# Altium PCB STM32H743I-EVAL2PCBDESIGN.PcbDoc (part 12 of 23)
Units mil, origin at the board's own origin, x right, y up, seen from the top; angles counter-clockwise.
Board outline 6558 x 5417 mil, 8 copper layers (L1_TOP, L2_GND, L3_HS1, L4_POWER, L5_SIG, L6_HS2, L7_GND, L8_BOTTOM), stack 61.368 mil thick; 620 components, 588 nets, 2945 pads, 1724 vias.
Unrouted connection lines stored in the file: 1.
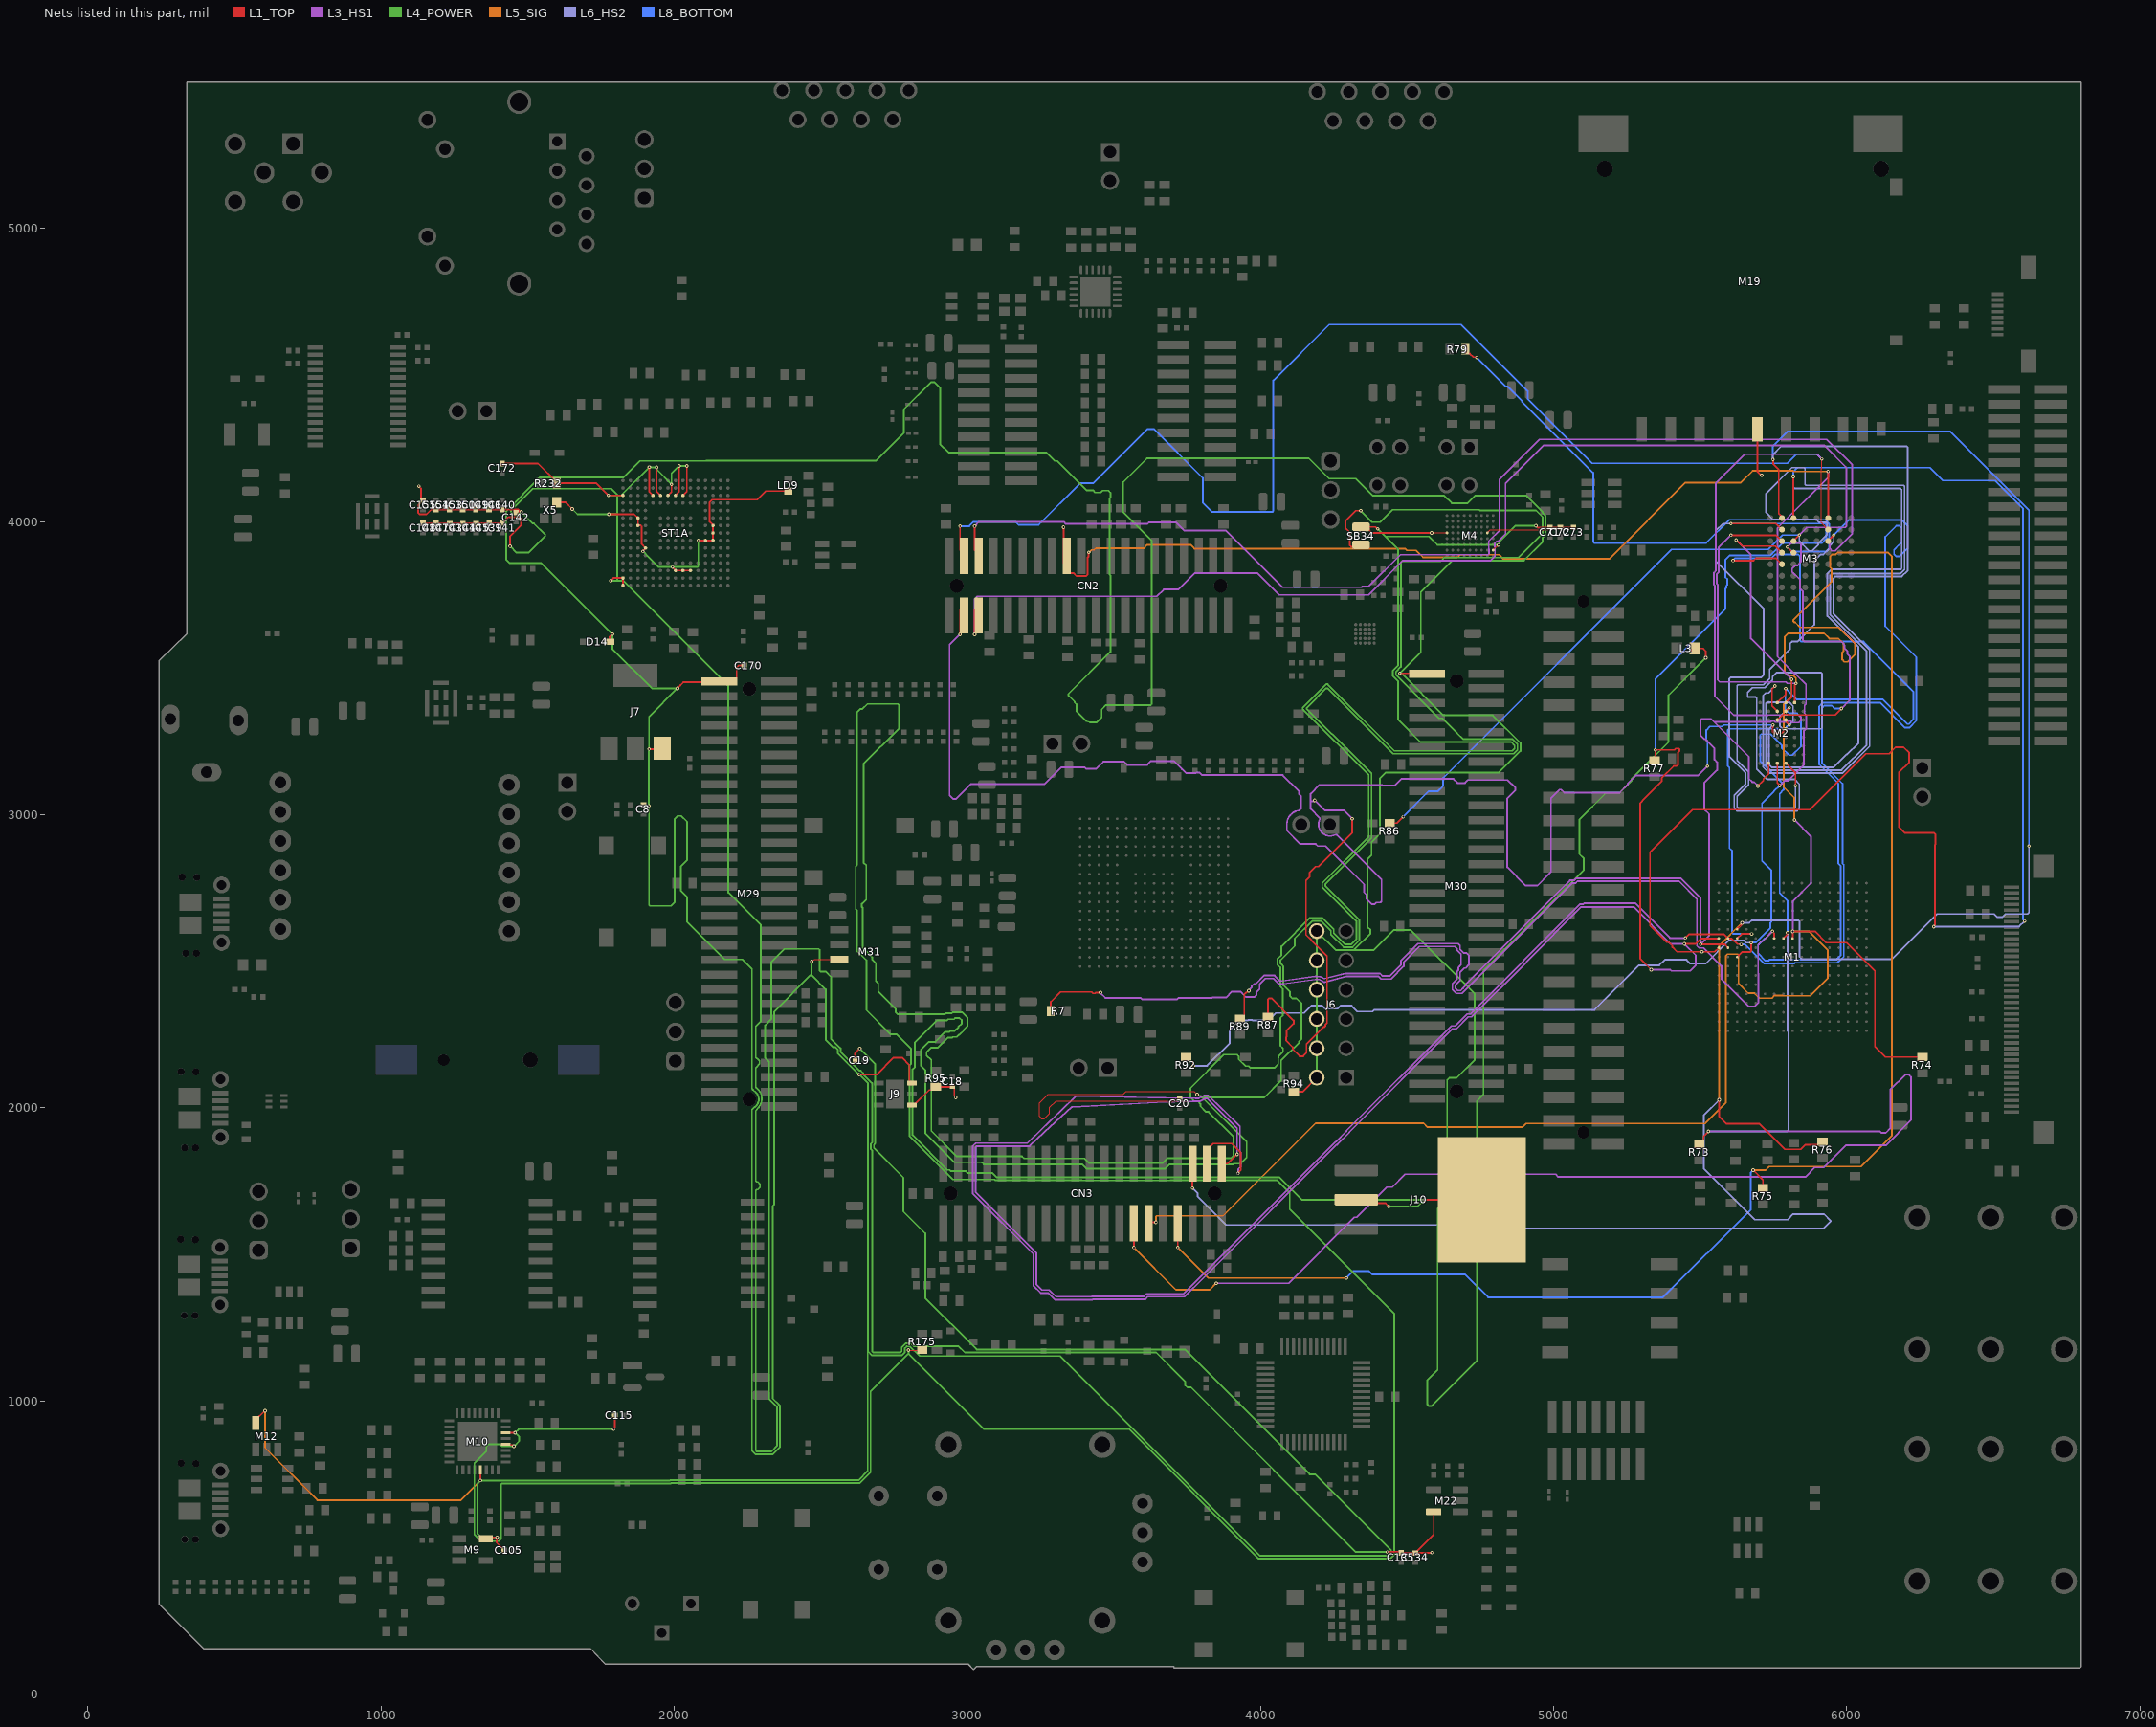
[diagram p9: the nets of this part, all layers, seen from the top]

## Via types
v1: diameter 12, hole 6, L1_TOP to L8_BOTTOM, tented both sides, 1724 vias

## Nets (pads, with @x,y where several pads share a name; then routed paths per layer and width w, separated by ;. In a path a pad name is that pad's centre, name@x,y a point inside that pad or via, vN(x,y) a via of type N, cw(c..) or ccw(c..) an arc to the next point about the centre after c; other vN are vias at no path point)
+1V8: C71.1 C72.1 C73.1 C115.1 M4.D1 M4.D8 M4.G9 M10.28 M10.30 R175.2 SB34.2 | length 18132
  L1_TOP w2: M4.D8@4774.06,3961.69 4783.75,3971.38 4978.53,3971.38 4978.76,3971.62 4979.78,3971.62 C71.1@4988,3979.83
  L1_TOP w4: v1(2799,1173) 2845.56,1173 R175.2@2846,1173.44 ; v1(4584,3961.43) M4.D1@4636,3961.43 ; M4.G9@4793.74,3902.63 v1(4812,3920)
  L1_TOP w6: M10.28@1425.5,851 1427.5,849 1447.38,849 1451.38,845 v1(1453,845) ; M10.30@1425.5,891 v1(1457,891) ; v1(1793.73,903.47) 1793.73,905.1 1797.17,908.53 C115.1@1797.17,950 ; SB34.2@4343,3982 SB34.2@4358,3982 ; v1(4400,3975) 4398.38,3975 4391.38,3982 SB34.2@4358,3982 ; v1(4584,3961.43) 4378.57,3961.43 SB34.2@4358,3982 ; v1(4940,3986) 4946.17,3979.83 C71.1@4988,3979.83 C72.1@5023,3979.83 C73.1@5068,3979.83
  L4_POWER w6: v1(1793.73,903.47) 1469.47,903.47 v1(1457,891) 1471,877 1471,863 v1(1453,845) 1412.35,845 1405.35,852 1366.32,852 1359,844.68 1359,828.33 1318,787.33 1318,543.37 1340.37,521 1401.38,521 1409,528.62 1409,714.49 1412.51,718 1988.77,718 1989.77,719 2632.63,719 2670,756.37 2670,1032.24 2798.62,1160.86 ; v1(2799,1173) 2799.38,1172.62 2799.38,1160.86 3057.24,903 3552.38,903 3994.38,461 4442.53,461 4456,474.47 4456,1298 4099.78,1654.22 4099.78,1708.83 4055.62,1753 3692.99,1753 3691.99,1752 3390.01,1752 3389.01,1753 3095.38,1753 3093.38,1755 2950.33,1755 2803,1902.33 2803,1919.72 2803,2144.49 2807.51,2149 2807.51,2201.87 2758.95,2250.44 2738.34,2250.44 2656,2332.77 2656,2503.14 2623,2536.14 2623,2673.84 2619,2677.84 2619,2823.38 2623,2827.38 2623,3347.86 2636.07,3360.93 2642.07,3360.93 2659.14,3378 2762.49,3378 2766,3374.49 2766,3293.14 2646,3173.14 2646,2836.53 2655,2827.53 2655,2710.57 2640.16,2695.73 2640.16,2684.96 2643,2682.12 2643,2545 2654,2534 2654.83,2534 2676,2512.83 2676,2504.62 2688,2492.62 2688,2433 2696,2425 2696,2396.86 2756,2336.86 2756,2325.51 2762.51,2319 2923.22,2319 2926.22,2322 2945.95,2322 2949.95,2326 2981.67,2326 3001,2306.67 3001,2279.33 2988.91,2267.24 2988.91,2265.05 2973.05,2249.19 2971.76,2249.19 2964.28,2241.71 2950.19,2241.71 2947.47,2239 2933.33,2239 2899.33,2205 2876.62,2205 2861,2189.38 2861,2178.62 2877,2162.62 2877,1920.86 2963.86,1834 3186.14,1834 3193.26,1826.88 3399.98,1826.88 3414.86,1812 3667.14,1812 3683.14,1828 3900.05,1828 3907,1834.95 3907,1901.62 3822.62,1986 3814.72,1986 3795,2005.72 3795,2013.38 3787.38,2021 3775.47,2021 3761,2035.47 3761,2067.14 3874.86,2181 3920.27,2181 3926,2175.27 3926,2165.27 3949.27,2142 3959.27,2142 3965.27,2136 4047.04,2136 4060.41,2149.37 4060.41,2169.41 4061.69,2170.69 4061.69,2176.3 4077,2191.62 4077,2202.38 4068,2211.38 4068,2306.67 4076.15,2314.82 4076.15,2405.21 4068.15,2413.21 4068.15,2478.33 4063,2483.47 4058,2488.47 4058,2507.53 4071.5,2521.03 4071.5,2550.5 4169,2648 4210.64,2648 4249.93,2608.71 4249.93,2595.57 4287.5,2558 4310.28,2558 4327,2574.72 4327,2637.14 4210.96,2753.18 4210.96,2766.44 4369,2924.47 4369,3136.81 4260.48,3245.33 4258.14,3245.33 4143.86,3359.61 4143.86,3364.58 4224.39,3445.11 4229.36,3445.11 4456.47,3218 4859.24,3218 4866.85,3225.62 4866.85,3236.38 4855.24,3248 4546,3248 4469,3325 4469,3455.47 4452,3472.47 4452,3491.53 4469,3508.53 4469,3906 4426,3949 ; v1(4400,3975) 4426,3949 ; v1(4940,3986) 4869.62,3986 4813.15,3929.53 4813.15,3921.15 v1(4812,3920) 4621.38,3920 4619.38,3922 4618.38,3921 4603.38,3921 4575.38,3949 4426,3949
+1V8_LDO: C20.1 J10.2 J10.4 SB34.1 | length 11238.3
  L1_TOP w4: C20.1@3724,2030.83 3716.78,2023.62 3302.65,2023.62 3280,2000.97 3280,1980.03 3262.97,1963 3253.03,1963 3246,1970.03 3246,2016.73 3275.27,2046 3531.04,2046 3541.09,2056.05 3772.95,2056.05 v1(3784,2045)
  L1_TOP w6: J10.2@4327.03,1686 4338.65,1674.38 4426.62,1674.38 v1(4438,1663) ; v1(4342,4037) 4324.62,4037 4291,4003.38 4291,3976.98 4305,3962.98 4305,3918.69 4309.69,3914 4316.34,3914 4323.34,3921 SB34.1@4343,3921 ; v1@4558,1685 4559,1686 J10.4@4755.38,1686
  L4_POWER w6: v1(3784,2045) 3785.62,2045 3789.62,2041 3795.67,2041 3801.67,2035 3801.9,2035 ; v1(4342,4037) 4381,3998 4408.86,3998 4451.24,4040.38 4746.24,4040.38 4748.62,4038 4940.14,4038 4963,4015.14 4963,3959.86 4880.14,3877 4627,3877 4615,3865 4482.51,3865 4479,3861.49 4479,3504.38 4462,3487.38 4462,3476.62 4609.62,3329 4620.38,3329 4670,3279.38 4670,3279 4691,3258 4859.38,3258 4876.85,3240.53 4876.85,3221.47 4863.38,3208 4452.33,3208 4229.36,3430.97 4224.39,3430.97 4158.01,3364.58 4158.01,3359.61 4242.83,3274.78 4245.17,3274.78 4379,3140.95 4379,2920.33 4220.96,2762.29 4220.96,2757.32 4337,2641.28 4337,2570.57 4314.43,2548 4283.36,2548 4239.93,2591.43 4239.93,2604.57 4206.5,2638 4177.5,2638 4117,2577.5 4117,2552.38 4068,2503.38 4068,2492.62 4073,2487.62 4078.15,2482.47 4078.15,2417.35 4101,2394.5 4101,2380.62 4108.62,2373 4122.5,2373 4140,2355.5 4140,2234.86 4132,2226.86 4132,2222.62 4070.41,2161.03 4070.41,2093.03 4012.38,2035 3801.9,2035 ; v1(4438,1663) 4536,1663 v1(4558.5,1685.5) 4141.5,1685.5 4064,1763 3688.85,1763 3687.85,1762 3394.15,1762 3393.15,1763 3099.53,1763 3085.65,1776.88 3001.51,1776.88 2994.38,1784 2943.15,1784 2939.15,1788 2931.47,1788 2813,1906.47 2813,1923.86 2813,2131 2821,2139 2821,2223.38 2895.08,2297.47 2929.97,2297.47 2934.5,2302 2954.24,2302 2958.24,2306 2973.38,2306 2981,2298.38 2981,2287.62 2968.91,2275.52 2968.91,2273.33 2964.76,2269.19 2963.47,2269.19 2956,2261.71 2941.9,2261.71 2939.19,2259 2925.05,2259 2891.05,2225 2868.33,2225 2841,2197.67 2841,2143.57 2857,2127.57 2857,1912.57 2955.57,1814 3048.85,1814 3055.97,1806.88 3391.69,1806.88 3406.57,1792 3675.43,1792 3690.31,1806.88 3907.21,1806.88 3909.33,1809 3932.14,1809 3953,1829.86 3953,1883.9 3801.9,2035
+2V9: M19.4 | length 163.6
  L1_TOP w6: M19.4@5695.02,4314.24 5695,4171 5699.24,4166.76 5699.62,4166.76 5708.38,4158 v1(5710,4158)
+2V9_SD: C18.1 J9.4 R95.2 | length 210.5
  L1_TOP w6: J9.4@2810.5,2009.6 2818.76,2009.6 2869.83,2060.66 2882.22,2060.66 R95.2@2893,2071.44 2946.44,2071.44 C18.1@2949,2074 ; C18.1@2946,2071 2952.08,2071 2955.3,2067.78 2955.3,2041.32 2960,2036.62 v1(2960,2035)
+3V3_ST_LINK: C134.1 C135.1 C139.1 C140.1 C141.1 C142.1 C143.1 C144.1 C145.1 C146.1 C147.1 C148.1 C149.1 C150.1 C153.1 C154.1 C155.1 C172.2 LD9.2 M22.5 R232.1 ST1A.C1 ST1A.C5 ST1A.C6 ST1A.C7 ST1A.C8 ST1A.C9 ST1A.F3 ST1A.G3 ST1A.G13 ST1A.H13 ST1A.J12 ST1A.J13 ST1A.K4 ST1A.N8 ST1A.N9 ST1A.N10 ST1A.P1 ST1A.R1 X5.4 | length 13685.6
  L1_TOP w6: v1(1129,4121) 1129,4119.38 1136.7,4111.68 1136.7,4079.05 C155.1@1142.92,4072.83 ; C148.1@1143,3993.83 1186.83,3993.83 C147.1@1187,3994 1187.33,3993.67 C143.1@1234,3993.67 C144.1@1279,3993.67 C145.1@1324,3993.67 1368.83,3993.67 C139.1@1369,3993.83 1369.83,3994.67 C141.1@1413,3994.67 ; C172.2@1413,4198 1535.5,4198 1598.56,4134.94 R232.1@1598.56,4131 1733.91,4131 v1(1775.36,4089.54) ST1A.C1@1824.64,4089.54 ; C141.1@1413.08,3994.67 1433.8,4015.38 1472.2,4015.38 1476.3,4011.28 1476.3,3987.05 1440,3950.75 v1(1440,3916) ; C142.1@1460,4030.83 1462.17,4033 v1(1478,4033) 1476.38,4033 1468.21,4041.17 C140.1@1413,4041.17 C146.1@1368,4041.17 1323.17,4041.17 C149.1@1323,4041 1278.17,4041 C150.1@1278,4041.17 1233.17,4041.17 C153.1@1233,4041.33 C154.1@1188,4041.33 1171.58,4041.33 1155.2,4024.95 1130.8,4024.95 1126.7,4029.05 1126.7,4056.62 C155.1@1142.92,4072.83 ; X5.4@1599.31,4066 1629,4066 v1(1652,4043) ; v1(1777,4025) 1863.59,4025 ST1A.F3@1876.23,4012.36 ST1A.G3@1876.23,3986.77 1876.46,3987 1885.49,3987 1889,3983.49 1889,3922.82 ST1A.K4@1901.82,3910 1901.82,3908.43 1893,3899.61 v1(1893,3898) ; v1(1783,3798) 1792.64,3807.64 ST1A.P1@1825.05,3807.64 ST1A.R1@1825.05,3782.05 ; v1(1915,4186) 1915,4101.54 ST1A.C5@1927.41,4089.13 ; v1(1940,4185) 1940,4102.13 ST1A.C6@1953,4089.13 ; ST1A.C7@1978.59,4089.13 1991,4101.54 v1(1991,4127) ; v1(1994,3845) 1994,3844.2 2004.18,3834.02 ST1A.N8@2004.18,3833.23 ST1A.N9@2029.77,3833.23 ST1A.N10@2055.36,3833.23 ; ST1A.C8@2004.18,4089.13 2017,4101.95 v1(2017,4190) ; ST1A.C9@2029.77,4089.13 2043,4102.36 v1(2043,4190) ; v1(2082.41,3935.59) ST1A.J12@2106.54,3935.59 ST1A.J13@2132.13,3935.59 ST1A.H13@2132.13,3961.18 2132.13,3987.85 2121,3998.99 2121,4066.42 2129.58,4075 2282.38,4075 2311.68,4104.3 LD9.2@2389,4104.3 ; v1(4433,484) 4477,484 4480.17,480.83 4582.21,480.83 4583.38,482 v1(4585,482) ; C134.1@4528.08,480.83 4590.92,543.67 M22.5@4590.92,621.6 ; C155.1@1142.92,4072.83 C155.1@1143,4072.83 C155.1@1142.92,4072.83
  L4_POWER w6: v1(1440,3916) 1462,3894 1503,3894 1559.64,3950.64 1559.64,3955.61 1521.51,3993.73 1517.27,3993.73 v1(1478,4033) 1476.38,4033 1472.38,4029 1446.28,4029 1442.77,4032.51 1442.77,4037.49 1517.83,4112.54 1784.89,4112.54 1789.32,4108.11 1806,4091.43 1806,4089.54 ; v1(1652,4043) 1670,4025 v1(1777,4025) 1805,4025 1806,4026 ; v1(1775.36,4089.54) 1806,4089.54 ; v1(1783,3798) 1806,3798 ; v1(1893,3898) 1893.98,3898 1912.95,3879.02 1946.98,3845 v1(1994,3845) 2078.89,3845 2082.41,3848.51 v1(2082.41,3935.59) ; v1(2043,4190) v1(2017,4190) 1991,4164 v1(1991,4127) 1941.15,4176.85 1941.15,4183.85 v1(1940,4185) 1939.5,4185.5 1915.5,4185.5 v1(1915,4186) 1818.54,4089.54 1806,4089.54 ; v1(4433,484) 4325,484 3763,1046 3750.62,1046 3743,1053.62 3743,1066 3644,1165 2991.38,1165 2970.38,1186 2818.53,1186 2808.53,1196 2789.47,1196 2776,1182.53 2776,1168.51 2772.49,1165 2678.51,1165 2675,1168.51 2675,1854.47 2671,1858.47 2671,1877.53 2675,1881.53 2675,2084 2644,2115 2644,2118.38 2636.38,2126 2633,2126 2567.6,2191.4 2567.6,2202.93 2535,2235.53 2535,2446.49 2517.49,2464 2499.7,2464 2496.18,2467.51 2496.18,2538.49 2492.67,2542 2376.61,2542 2330.99,2496.38 2330.99,2302.32 2310,2281.33 2310,2169.68 2323.5,2156.18 2323.5,1005.97 2351,978.47 2351,846.86 2331.14,827 2281.51,827 2278,830.51 2278,1717.49 2281.51,1721 2285.38,1721 2293,1728.62 2293,1739.38 2285.38,1747 2281.51,1747 2278,1750.51 2278,1989.49 2288.19,2001.36 ccw(c2253.91,2030.8) 2283.56,2064.89 2280.03,2067.62 2278,2069.65 2278,2136.03 2279.67,2137.77 2291.01,2149.62 2291.01,2160.38 2283.39,2168 2281.48,2168 2279.76,2169.73 2278,2171.48 2278,2277.62 2295.62,2295.23 2295.62,2622.99 2184.68,2733.92 2184.68,3440.33 1827.02,3798 1806,3798 ; 1806,3798 1806,4026 ; 1806,4026 1806,4089.54
+5V: C8.1 C19.1 C105.1 C170.1 D14.2 J6.02 J6.04 J6.06 J6.08 J6.10 J6.12 J7.3 J9.6 L3.2 M9.5 M10.21 M12.5 M29.60 M30.60 M31.3 R94.1 | length 32121.3
  L1_TOP w4: v1(2469,2499) 2471.16,2499 2478.16,2506 2561.7,2506 M31.3@2562.7,2507
  L1_TOP w6: M12.5@572.6,924.28 572.6,936.09 602.51,966 v1(604,966) ; v1(1339,728) M10.21@1339,764.5 ; M9.5@1357.28,529.4 1369.09,529.4 1373.8,534.12 1395.88,534.12 v1(1396,534) 1394.85,532.85 1394.85,522.77 1394.08,522 1394.08,516 1420,490.08 C105.1@1420,490 ; D14.2@1779.13,3590 1779.13,3606.13 v1(1789,3616) ; C8.1@1895,3033.83 1898.83,3030 v1(1914,3030) ; v1(1914,3224) 1955.57,3224 J7.3@1958.55,3226.98 ; v1(2011,3431) 2021,3441 2021,3441.94 2031.06,3452 2152.5,3452 M29.60@2154.5,3454 2202.02,3454 2213.02,3465 2213.02,3502.07 2219.95,3509 C170.1@2238.17,3509 ; C19.1@2617.17,2162 2617.17,2186.17 v1(2633,2202) ; v1(2631,2113) 2690.38,2113 2748.38,2171 2777,2171 2802.23,2145.77 2802.23,2089.67 2807.5,2084.4 J9.6@2810.5,2084.4 ; R94.1@4114,2054.44 4143.44,2054.44 J6.02@4192,2103 ; v1(4475,3482) 4567,3482 M30.60@4568,3481 ; L3.2@5482.59,3567.02 5510.09,3567.02 5519,3558.11 v1(5519,3535)
  L4_POWER w6: v1(1396,534) 1341.51,534 1328,547.51 1328,717 v1(1339,728) 1984.63,728 1985.63,729 2628.49,729 2660,760.51 2660,1168.37 2660,1854.33 2660,1881.67 2660,2084 ; v1(2469,2499) 2469,2452 2464.63,2452 2340.99,2328.36 2340.99,1670.48 2336,1665.49 2336,1007.62 2356,987.62 2361,982.62 2361,842.72 2356,837.72 2335.28,817 2277.37,817 2265.01,829.36 2265.01,1993.63 2268.52,1997.14 2273.41,2001.56 2275.16,2002.84 ccw(c2256,2029) 2277.29,2053.46 2268.52,2061.11 2265.01,2064.62 2265.01,2472.85 2231.86,2506 2172,2506 2044,2634 2044,2718.69 2023,2739.69 2023,2824.38 2044,2845.38 2044,2975.38 2023.38,2996 2012.62,2996 2000.85,2984.23 2000.85,2700.7 1989.07,2688.93 1917.51,2688.93 1914,2692.44 v1(1914,3030) 1913,3031 1913,3223 v1(1914,3224) 1914,3334 v1(2011,3431) 1924,3431 1789,3566 v1(1789,3616) 1547,3858 1438.51,3858 1427,3869.51 1427,4035.86 1542.14,4151 1827,4151 1883,4207 2109.62,4207 2110.62,4208 2689.5,4208 2783.06,4301.56 2783.06,4382.44 2876.62,4476 2887.38,4476 2907,4456.38 2907,4264.62 2935.81,4235.81 3268.86,4235.81 3297.67,4207 3306,4207 3406,4107 3428.38,4107 3436,4099.38 3454.88,4099.38 3461.5,4106 3480.38,4106 3488,4098.38 3488,4081.28 3485,4078.28 3485,3819.38 3488,3816.39 3488,3555 3344.73,3411.73 3344.73,3406.76 3366,3385.49 3366,3382.59 3373,3375.59 3373,3352 3405.8,3319.2 cw(c3389,3242) 3418.37,3315.34 3441.53,3315.34 3458.1,3331.91 3458.1,3358.96 3473.14,3374 3625.49,3374 3629,3377.51 3629,3934.67 3531,4032.67 3531,4134.38 3612.62,4216 4164.92,4216 4234.42,4146.5 4325.77,4146.5 4383.79,4088.48 4627.13,4088.48 4652.61,4063 4706.39,4063 4731.61,4088.22 4907.68,4088.22 4963,4032.9 4963,4029.28 4973,4019.28 4973,3955.72 4965,3947.72 4963,3945.72 4963,3931.1 4898.9,3867 4654.62,3867 4547,3759.38 4547,3554 v1@4478.07,3485.07 ; 2469.1,2451.5 2517,2403.6 2517,2232.12 2542.72,2206.4 2549.98,2206.4 2557.6,2198.79 2557.6,2186.4 v1(2631,2113) ; v1(2633,2202) 2685,2150 2685,1877.38 2681,1873.38 2681,1862.62 2781.65,1761.96 2781.65,1646.2 2856.31,1571.55 2856.31,1350.31 3031.62,1175 3741.62,1175 4167.62,749 4186.38,749 4446,489.38 4446,478.62 4438.38,471 3998.53,471 3316.53,1153 2837.38,1153 2804.38,1186 2793.62,1186 2786,1178.38 2786,1164.37 2776.63,1155 2674.37,1155 2661,1168.37 2661,1854.33 2661,1881.67 2661,2083.86 2660.43,2084.43 v1@2634,2110.86 ; J6.02@4192,2103 J6.04@4192,2203 J6.06@4192,2303 J6.08@4192,2403 J6.10@4192,2503 J6.12@4192,2603 4257,2538 4318.57,2538 ; v1(4475,3482) v1@4478.07,3485.07 ; v1(5519,3535) 5391.83,3407.83 5391.83,3247.44 5265.8,3121.42 5265.8,3115.42 5225.38,3075 5179.64,3075 5087.86,2983.22 5087.86,2865.93 5103,2850.79 5103,2810.64 4761,2468.64 4761,2045.08 4738,2022.08 4738,1136.38 4583.46,981.84 4575.17,981.84 4569.31,987.7 4569.31,1071.36 4604,1106.05 4604,1656.05 4637,1689.05 4637,2094.38 4644.62,2102 4669.43,2102 4731,2163.57 4731,2388 4513,2606 4454.38,2606 4386.38,2538 4318.57,2538 ; 4318.57,2538 4375,2594.43 4375,2606.62 4366,2615.62 4366,2849 4379,2862 4379,2906.19 4407,2934.19 4407,3123.38 4427.62,3144 4813.52,3144 4886.85,3217.33 4886.85,3244.67 4792.52,3339 4624.14,3339 v1@4478.07,3485.07
  L5_SIG w6: v1(604,966) 604,839.47 782.47,661 1272,661 v1(1339,728)
A0: CN3.14 M1.G8 M2.A3 M3.E2 R73.2 | length 8036.3
  L1_TOP w6: v1(3568,1523) CN3.14@3568,1606 ; R73.2@5497,1876 5500.94,1876 5511.72,1886.78 5511.72,1902.72 v1(5528,1919) ; v1(5612,3867) 5682.31,3867 5690.2,3874.89 5758.89,3874.89 M3.E2@5779.26,3854.52 ; M2.A3@5763.42,3382.11 5792,3410.69 v1(5792,3430) ; M1.G8@5784.24,2577.76 5796.85,2590.37 5796.85,2595.85 v1(5798,2597)
  L3_HS1 w6: v1(3849,1401) 4095.86,1401 4320.86,1626 4327.62,1626 4430.62,1729 4449.86,1729 4493.86,1773 5006.69,1773 5015.81,1763.88 5859.02,1763.88 5891.02,1795.88 5920.88,1795.88 5996.51,1871.51 6133.14,1871.51 6219,1957.37 6219,2105.38 6211.38,2113 6200.62,2113 6149,2061.38 6149,1929.47 6133.95,1914.42 6118.05,1914.42 6113.47,1919 v1(5528,1919)
  L5_SIG w6: v1(3568,1523) 3712,1379 3827,1379 v1(3849,1401)
  L6_HS2 w6: v1(5528,1919) 5796,1919 5802,1925 5802,2258.19 5798,2262.19 v1(5798,2597)
  L8_BOTTOM w6: v1(5612,3867) 5620,3875 5744.14,3875 5757.14,3888 5834.1,3888 5841,3881.1 5841,3593.92 5844.51,3590.41 6057.42,3590.41 6227.42,3420.41 6227.42,3325.13 6211.63,3309.34 6206.66,3309.34 6122.63,3393.37 5828.63,3393.37 v1(5792,3430) 5791,3429 5791,3359.62 5804.62,3346 5830.38,3346 5844,3332.38 5844,3232.62 5814.38,3203 5803.62,3203 5778.5,3228.12 5778.5,3236.88 5740.38,3275 5708.51,3275 5705,3271.49 5705,3184 5785,3104 5785,3085 5771.47,3071.47 5771.47,2733.27 5798,2706.74 v1(5798,2597)
A1: CN3.12 M1.G9 M2.A4 M3.D2 R74.2 | length 5949.1
  L1_TOP w6: CN3.12@3618,1606 3621,1609 v1(3643,1609) ; v1(5623,3937) 5643.79,3916.21 5756.94,3916.21 M3.D2@5779.26,3893.89 ; M2.A4@5792.94,3382.11 5812,3401.17 v1(5812,3462) ; M1.G9@5815.74,2577.76 v1(5815.74,2601.75) 5891.45,2601.75 5930.19,2563 5999.4,2563 6096,2466.4 6096,2209 6131.98,2173.02 R74.2@6258.49,2173.02
  L3_HS1 w6: v1(5623,3937) 5673,3887 5673,3601 v1(5812,3462) ; v1(5815.74,2601.75) 5815.74,2704.25 5878,2766.51 5878,2925.94 v1(5821.83,2982.12)
  L5_SIG w6: v1(3643,1609) 3643,1627.5 3646.51,1631.01 3872.01,1631.01 4188,1947 4556.38,1947 4569.81,1933.57 4893.1,1933.57 4905.52,1946 5516.53,1946 5588,2017.47 5588,2519 5593,2524 5627.49,2524 5631,2520.49 5631,2424 5664,2391 5685.53,2391 5702.53,2374 5744.53,2374 5753.53,2383 5780.38,2383 5781.38,2382 5876.28,2382 5935,2440.72 5935,2538 5871.25,2601.75 v1(5815.74,2601.75) ; v1(5812,3462) 5812,3403.76 5785,3376.76 5785,3094.62 5821,3058.62 5821,2982.94 v1(5821.83,2982.12)
A2: CN3.08 M2.A5 M3.C2 R75.2 | length 7298.6
  L1_TOP w6: v1(3718,1523) CN3.08@3718,1606 ; v1(5605,3953.63) 5758.89,3953.63 M3.C2@5779.26,3933.26 ; v1(5681,1787) 5714,1754 R75.2@5714,1726 ; M2.A5@5822.47,3382.11 5822.47,3441.85 5827,3446.38 v1(5827,3448)
  L3_HS1 w6: v1(5605,3953.63) 5563,3911.63 5563,3827.38 5557,3821.38 5557,3810.62 5557,3788.62 5560,3785.62 5560,3459.51 5566.51,3453 5792.62,3453 5797.62,3448 v1(5827,3448)
  L5_SIG w6: v1(3718,1523) 3822,1419 v1(4293,1419) ; v1(5681,1787) 5723.12,1787 5735.12,1799 6049.49,1799 6154,1903.51 6154,3882.11 6142.11,3894 5968.64,3894 5962.9,3888.26 5950.73,3888.26 5943.11,3880.64 5943.11,3844.31 5948.12,3839.3 5948.12,3794.65 5817.96,3664.49 5817.96,3659.51 5821.47,3656 5824.38,3656 5841.38,3639 5972.53,3639 6028.74,3582.79 6028.74,3547.02 6003.12,3521.41 5992.36,3521.41 5984.74,3529.02 5984.74,3553.59 5989.37,3558.22 5989.37,3582.79 5971.27,3600.9 5940.49,3600.9 5922.38,3619 5800.37,3619 5788,3606.63 5788,3487 5800,3475 5817.38,3475 5827,3465.38 v1(5827,3448)
  L8_BOTTOM w6: v1(4293,1419) 4317,1443 4369.72,1443 4381.72,1431 4698.75,1431 4776.75,1353 5373,1353 5673,1653 5673,1779 v1(5681,1787)
A3: CN3.05 M1.F3 M2.B3 M3.A2 R76.2 | length 10672.7
  L1_TOP w6: v1(3768,1725.99) CN3.05@3768,1808.99 ; v1(5565,2027) 5565,1969.47 5589.47,1945 5702.7,1945 5789.48,1858.22 5843.55,1858.22 5859.11,1873.78 5907.22,1873.78 R76.2@5918,1884.56 ; M1.F3@5626.51,2609.01 5641.85,2624.35 5641.85,2629.85 v1(5643,2631) ; v1(5748,4212) 5749.05,4210.95 5749.05,4197 5768,4178.05 5768,4027.05 5779.26,4015.79 M3.A2@5779.26,4012 ; v1(5755,3439) 5755,3437.79 5745,3427.79 5745,3371 M2.B3@5763.42,3352.58
  L5_SIG w6: v1(5565,2027) 5565,2553 v1(5643,2631)
  L6_HS2 w6: v1(3768,1725.99) 3785.88,1708.11 3785.88,1696.73 3882.62,1600 4840.83,1600 4852.83,1588 5921.03,1588 5946.21,1613.18 5922.38,1637 5817.63,1637 5798.63,1618 5686,1618 5513,1791 5513,1975 v1(5565,2027) ; v1(5643,2631) 5667.33,2631 5675.33,2639 5835.49,2639 5839,2635.49 5839,2515 5847,2507 6155.14,2507 6309.09,2660.94 6502.47,2660.94 6512.47,2650.94 6531.53,2650.94 6541.53,2660.94 6617.49,2660.94 6622,2665.46 v1(6622,2893) ; v1(5748,4212) 5748,4228 5777,4257 6203.97,4257 6207.48,4253.49 6207.48,3832.23 6188.25,3813 5961.03,3813 5954,3805.97 5954,3685.82 6078,3561.82 6078,3233.33 5986.65,3141.98 5735.16,3141.98 5715,3162.14 5715,3407 5723.37,3415.37 5733.74,3415.37 5743.8,3425.42 5743.8,3427.8 v1(5755,3439)
  L8_BOTTOM w6: v1(5748,4212) 5748,4257 5799,4308 6352.14,4308 6622,4038.14 v1(6622,2893)
A4: CN3.03 M1.G1 M2.B4 M3.B2 R77.2 | length 10583.9
  L1_TOP w6: CN3.03@3818,1808.99 3818,1856.51 3839,1877.51 3901.88,1877.51 3933,1846.38 3933,1787.21 3923,1777.21 v1(3923,1776) ; v1(5333,2471) 5296,2508 5296,3039.33 5303,3046.33 5303,3047.6 5368.72,3113.32 5368.72,3125.03 5409.98,3166.3 5420.61,3166.3 5424.71,3170.4 5424.71,3212.22 5429.74,3217.25 5429.74,3222.22 5426.23,3225.73 5416.61,3225.73 5411.88,3221 v1(5347,3221) 5347,3188.12 R77.2@5344,3185.12 ; v1(5446,2559) 5484.62,2559 5503.13,2577.51 M1.G1@5563.02,2577.51 ; v1(5605,3993) 5758.89,3993 M3.B2@5779.26,3972.63 ; M2.B4@5792.94,3352.58 5792.94,3353.26 5804,3364.32 v1(5804,3365)
  L3_HS1 w6: v1(3923,1776) 3924.15,1777.15 3924.15,1790.29 3933,1799.14 3933,1846.38 3930,1849.38 3930,1936 3926.49,1939.51 3821.53,2042 3808.27,2042 3789.38,2032 3778.69,2032 3375.48,2039.2 3370.57,2039.2 3204.51,1879 3123.39,1879 3112.62,1878.99 3028.37,1879 3018,1868.63 3018,1708.38 3225,1501.38 3225,1393.19 3250.19,1368 3275.19,1368 3298.19,1345 3426.96,1345 3427.96,1346 3606.43,1346 3615.43,1355 3741.19,1355 3806,1419.81 4260.19,1874 4261.99,1874 4303,1915.01 4303,1916.81 4655.47,2269.28 4668.61,2269.28 4709.33,2310 4720.66,2310 4907.64,2496.98 4907.64,2498.02 5094.62,2685 5273,2685 5399,2559 v1(5446,2559) 5485,2520 5485,2486.62 5465.38,2467 5402,2467 5398,2471 v1(5333,2471)
  L6_HS2 w6: v1(5605,3993) 5578,3993 5553,3968 5553,3866.53 5717,3702.53 5717,3476.62 5708.38,3468 5603.13,3468 5599.62,3464.49 5599.62,3197.77 5655,3142.38 5655,3105.33 5616,3066.33 5616,3022.37 5625.37,3013 5830.49,3013 5838,3020.51 5838,3104.38 5821.38,3121 5727.86,3121 5693,3155.86 5693,3397.49 5689.49,3401 5662,3401 5662,3416.38 5678.62,3433 5720.14,3433 5747,3459.86 5747,3470.38 5761.62,3485 5912.49,3485 5916,3481.49 5916,3296.51 5912.49,3293 5781.51,3293 5772,3302.51 5772,3333 v1(5804,3365)
  L8_BOTTOM w6: v1(5347,3221) 5347,3462.62 5585.53,3701.14 5585.53,3770.38 5589,3773.86 5589,3780.47 5593,3784.47 5593,3803.53 5585.53,3811 5585.53,3869.68 5600.85,3885 5740,3885 5781.26,3926.26 5914.26,3926.26 5930,3942 5930,3989.23 5926.23,3993 v1(5605,3993)
A5: CN3.01 M1.G2 M2.C3 M3.D3 R79.2 | length 9082.2
  L1_TOP w6: CN3.01@3868,1808.99 3887.99,1808.99 v1(3920,1841) ; R79.2@4699.56,4588 4699.56,4584.06 4710.34,4573.28 4714.28,4573.28 4726.41,4561.15 4736.85,4561.15 v1(4738,4560) ; v1(5450,2579) 5463,2592 5580.53,2592 M1.G2@5595.02,2577.51 5595.56,2576.96 5608.34,2576.96 5627.15,2558.15 5638.85,2558.15 v1(5640,2557) ; M2.C3@5763.42,3323.06 5782.44,3342.08 5799.37,3342.08 5801.43,3340.03 5960.03,3340.03 v1(5982,3362) ; v1(5797.89,3913.26) M3.D3@5817.26,3893.89
  L3_HS1 w6: v1(3920,1841) 3920,1929.38 3817.38,2032 3812.41,2032 3793.53,2022 3769.57,2022 3647.62,2018 3357.62,2003 3262.62,1917 3212.13,1869 3127.53,1869 3108.47,1868.99 3032.51,1869 3028,1864.49 3028,1712.53 3235,1505.53 3235,1397.33 3254.33,1378 3279.33,1378 3302.33,1355 3422.82,1355 3423.82,1356 3602.29,1356 3611.29,1365 3737.05,1365 4256.05,1884 4257.85,1884 4293,1919.15 4293,1920.95 4651.33,2279.28 4664.47,2279.28 4705.19,2320 4716.52,2320 4897.64,2501.12 4897.64,2502.17 5090.47,2695 5102,2695 5105,2698 5278,2698 5397,2579 v1(5450,2579) ; v1(5797.89,3913.26) 5810.89,3926.26 5840.12,3926.26 5843.63,3922.74 5843.63,3862.33 5831.34,3850.04 5823.66,3850.04 5814,3840.38 5814,3828.38 5841,3801.38 5841,3770.72 5851,3760.72 5851,3595 5855.59,3590.41 5981.75,3590.41 5989.37,3582.79 5989.37,3581.14 5992.25,3578.26 5992.25,3568.38 6002.74,3557.88 6002.74,3547.79 6010.74,3539.79 6010.74,3529.02 6010,3528.28 6010,3390 v1(5982,3362)
  L8_BOTTOM w6: v1(4738,4560) 4836.08,4461.92 4842.9,4461.92 4892,4412.81 4892,4409.86 5135,4166.86 5135,3930.51 5138.51,3927 5520.62,3927 5599.62,4006 5927.37,4006 5940,3993.37 5940,3907.62 5930.38,3898 5813.15,3898 v1(5797.89,3913.26) ; v1(5640,2557) 5653.5,2557 5718.73,2491.77 5819.94,2491.77 5822.94,2494.77 5967.68,2494.77 5971.91,2499 5974,2499 5990,2515 5990,2828.67 5986,2832.67 5986,3105.81 5916,3175.81 5916,3365 5923,3372 5949.5,3372 5959.5,3362 v1(5982,3362)
A6: CN2.05 M1.G3 M2.C4 M3.C3 R86.2 | length 9891.9
  L1_TOP w6: v1(3025,3615.5) 3025,3698.5 ; R86.2@4441,2971.56 4465.56,2971.56 v1(4487,2993) ; M1.G3@5626.51,2577.51 5642,2593 v1(5676,2593) ; M2.C4@5792.94,3323.06 5794.06,3321.94 5794.06,3317.83 5794.69,3317.21 5794.69,3315.31 v1(5804,3306) ; M3.C3@5818.63,3933.26 5818.63,3934.63 v1(5838,3954)
  L3_HS1 w6: v1(3025,3615.5) 3025,3736 3034,3745 3646.49,3745 3669.99,3768.5 3720.12,3768.5 3775.54,3823.93 3990.02,3823.93 4063.95,3750 4368.9,3750 4485.9,3867 4784.77,3867 4800,3882.23 4800,3913.62 4799,3914.62 4799,3925.38 4806.62,3933 4810.9,3933 4836,3958.1 4836,4130 4966.5,4260.5 5923.36,4260.5 5998.85,4185.01 5998.85,3983.51 5995.34,3980 5864,3980 v1(5838,3954)
  L6_HS2 w6: v1(5804,3306) 5817,3319 5817,3370.38 5803.4,3383.99 5728.51,3383.99 5725,3380.47 5725,3166.28 5739.3,3151.98 5982.51,3151.98 6068,3237.47 6068,3557.68 5944,3681.68 5944,3815.97 5951.03,3823 6184.11,3823 6197.48,3836.37 6197.48,4120.44 6193.97,4123.96 5861.51,4123.96 5858,4127.47 5858,4180.49 5854.49,4184 5812.99,4184 5725,4096.01 5725,4031 5749,4007 5896.28,4007 5906.28,3997 5930.49,3997 5934,3993.49 5934,3964.42 5933.11,3963.53 5933.11,3955.64 5903,3925.53 5903,3921.25 5882.01,3900.26 5871.25,3900.26 5851,3920.5 5851,3921.53 5838,3934.53 v1(5838,3954)
  L8_BOTTOM w6: v1(4487,2993) 4574,3080 4606.01,3080 4623,3096.99 4623,3125.28 5402.72,3905 5731.72,3905 5780.72,3954 v1(5838,3954) ; v1(5676,2593) 5612.51,2593 5609,2596.51 5609,2876.62 5600,2885.62 5600,3160.62 5594,3166.62 5594,3288.49 5598.51,3293 5788.47,3293 5797.47,3302 ; 5797.49,3302 5797.99,3302.5 5798.88,3302.5 5802.38,3306 v1(5804,3306)
A7: CN2.03 M1.H1 M2.D4 M3.A3 R87.2 | length 14088.2
  L1_TOP w6: v1(2975,3615.5) 2975,3698.5 ; R87.2@4026,2309.56 4026,2369.75 4029.51,2373.27 4038.01,2373.27 4113.45,2297.83 4113.45,2287.06 4089,2262.62 4089,2242.38 4087,2240.38 4087,2229.62 4110.31,2206.31 4110.31,2199.31 4133.62,2176 4145.79,2176 4157,2187.21 4157,2217.5 4214.5,2275 4217.49,2275 4221,2278.51 4221,2282.5 4227,2288.5 4227,2517.5 4174.25,2570.25 4174.25,2571.25 4155.35,2590.15 4155.35,2775.07 4167,2786.72 4167,2801.67 4188.33,2823 4198,2823 4313,2938 v1(4313,2985.84) ; M1.H1@5563.52,2546.02 5549.5,2532 v1(5506,2532) 5421.14,2532 5405,2548.14 5405,2552.53 5391.53,2566 5385,2566 5329,2622 5329,2871.26 5474.74,3017 5873.86,3017 6065.02,3208.16 6144.49,3208.16 6166.33,3230 6193.67,3230 6213,3210.67 6213,3179 6178,3144 6178,2957.62 6197.62,2938 6297.49,2938 6303,2932.49 6303,2899.62 6301,2897.62 6301,2623.62 6297,2619.62 v1(6297,2618) ; v1(5748,3306) 5748,3281.51 5751.51,3278 5777.42,3278 M2.D4@5792.94,3293.53 ; v1(5818,4154) 5818.31,4153.69 5818.31,4012.31 M3.A3@5818.5,4012.13
  L3_HS1 w6: v1(2975,3615.5) 2939,3579.5 2939,3065.62 2950.62,3054 2961.38,3054 3011.38,3104 3262.86,3104 3319.86,3161 3400.7,3161 3404.7,3157 3440.43,3157 3464.43,3181 3534.62,3181 3545.62,3170 3613.67,3170 3626.67,3183 3705.28,3183 3732,3156.28 3732,3155.47 3745.47,3142 3778.67,3142 3779.67,3143 3792.53,3143 3800.53,3135 4076,3135 4131,3080 4131,3071.47 4138,3064.47 4138,3020 4132.99,3014.99 ccw(c4138.79,2966.33) 4090.31,2973.49 cw(c4084.38,2974.38) 4089.78,2971.78 4089.78,2970.12 4089.78,2946.03 4135.82,2900 4188.31,2900 4195.31,2893 4222.23,2893 4353.57,2761.66 4353.57,2734.75 4361,2727.31 4361,2713.62 4374.6,2700.01 4379.62,2695 4390.38,2695 4395.4,2700.02 4409.61,2700.72 4411.24,2702.36 4413,2704.11 4413,2778 4259.22,2931.78 4256.73,2931.78 ; 4256.7,2931.78 4249.87,2929.44 cw(c4237.21,2966.33) 4202.66,2984.43 4202.66,2985.85 4202.66,2988.34 4171,3020 4171,3045.74 ; v1(4313,2985.84) 4283.84,3015 4219,3015 v1(4185,3049) 4181.74,3045.74 4171,3045.74 ; v1(5524.76,3165.46) 5492.49,3133.19 5279.81,3133.19 5252.6,3105.98 5252.6,3102.21 5225.38,3075 5036.38,3075 5025.87,3085.51 5020.9,3085.51 4991,3055.62 4991,2804.67 4984,2797.67 4984,2797.54 4944.46,2758 4904.69,2758 4842,2820.69 4842,3055.62 4869,3082.62 4869,3093.38 4858.58,3103.81 4857.42,3103.81 4843.23,3118 4707.66,3118 4697.66,3108 4672.38,3108 4658.38,3122 4480.38,3122 4458.38,3100 4415.47,3100 4414.23,3101.24 4200.76,3101.24 4171,3071.49 4171,3045.74
  L6_HS2 w6: v1(5748,3306) 5735,3293 5735,3170.43 5743.45,3161.98 5955.6,3161.98 5998.62,3205 6000.38,3205 6040,3244.62 6040,3571.53 5934,3677.53 5934,3823 5948,3837 6183.97,3837 6187.48,3840.51 6187.48,4108.52 6183,4113 5821.88,4113 5818,4116.88 v1(5818,4154) ; v1(6297,2618) 6588,2618 v1(6607,2637)
  L8_BOTTOM w6: v1(5524.76,3165.46) 5524.76,3251.14 5521,3254.9 5521,3288.38 5533.62,3301 5574.62,3301 5579.62,3306 v1(5748,3306) ; v1(5818,4154) 5818,4170.63 5831.37,4184 6283.62,4184 6327.62,4140 6506,4140 6601,4045 6601,2643.51 6607,2637.51 v1(6607,2637)
A8: CN2.04 M1.H2 M2.H2 M3.B6 R89.2 | length 9774.5
  L1_TOP w4: v1(5915.11,4214) 5915.11,4180.74 5913.74,4179.37 5913.74,3995.63 M3.B6@5936.74,3972.63
  L1_TOP w6: 2975,3901.5 v1(2975,3984.5) ; R89.2@3930,2304.56 3933.94,2304.56 3944.72,2315.34 3944.72,2386.83 3949.96,2392.07 3951.45,2392.07 3958.38,2399 v1(3960,2399) ; v1(5502,2558) 5583.03,2558 M1.H2@5595.02,2546.02 ; v1(5697,3098) 5716.02,3117.02 5716.02,3121.02 5733.89,3138.89 5733.89,3174.69 M2.H2@5734.25,3175.06
  L3_HS1 w6: v1(3960,2399) 3960,2400.62 3969.63,2410.26 3969.63,2414.02 3977.62,2422 3983.19,2422 4012.19,2451 4047.81,2451 4066,2432.81 4074.28,2432.81 4186.1,2447.61 cw(c4192,2403) 4216.79,2440.55 4219.28,2440.55 4288.18,2458 4407.57,2458 4416.27,2449.31 4441.12,2449.31 4478.76,2486.95 4478.76,2501.09 4537.67,2560 4673.97,2560 4681,2552.97 4681,2540.78 4693.78,2528 4703.38,2528 4711,2520.38 4711,2487.62 4699.98,2476.59 4696.02,2476.59 4681,2461.57 4681,2434.38 4665,2418.38 4665,2407.62 4672.62,2400 4683.38,2400 4691,2407.62 4691,2407.72 4701,2417.72 4701,2421.86 5020.67,2741.53 5021.25,2741.53 5055.72,2776 5069.86,2776 5076.89,2783.02 5388.4,2783.02 ; 5388.43,2783 5433.62,2783 5502,2714.62 v1(5502,2558) 5531,2587 5531,3001.53 5514,3018.53 5514,3108.03 5557.76,3151.79 5557.76,3179.13 5549,3187.89 5549,3226.28 5517.28,3258 5514,3258 5502,3270 5502,3323.49 5505.51,3327 5537,3327 5548.43,3315.57 5666,3198 5666,3123 5677.93,3111.07 5683.93,3111.07 v1(5697,3098) ; 5549.86,3317 5740.62,3317 5742.62,3319 5753.38,3319 5755.38,3317 5796.62,3317 5798.62,3319 5809.38,3319 5814.38,3314 5836.38,3314 5844,3321.62 5844,3332.38 5836.38,3340 5731.13,3340 5730.35,3339.22 5615.39,3339.22 5550,3404.62 5550,3781.47 5547,3784.47 5547,3825.53 5553,3831.53 5553,4130.86 5584,4161.86 5584,4162.38 5591.62,4170 5592.14,4170 5652.14,4230 5899.11,4230 v1(5915.11,4214)
  L8_BOTTOM w6: v1(2975,3984.5) 3006.62,3984.5 3021.12,3999 3164.38,3999 3174.38,3989 3243.43,3989 3385.43,4131 3429.5,4131 3614.5,4316 3636.21,4316 3803.12,4149.09 3803.12,4065.37 3835.49,4033 4040.49,4033 4044,4036.51 4044,4305.19 4043,4306.19 4043,4341.81 4044,4342.81 4044,4481.57 4234.43,4672 4684.14,4672 4912,4444.14 4912,4418.14 5131.14,4199 5797.38,4199 5828.38,4230 5899.11,4230 v1(5915.11,4214)
A9: CN2.18 M1.J3 M2.H3 M3.A6 R92.2 | length 7353.6
  L1_TOP w4: R92.2@3746,2173.56 3749.94,2173.56 3769.47,2154.03 3769.47,2144.53 v1(3771,2143)
  L1_TOP w6: v1(3328,3981) 3328,3858.58 3339,3847.59 3339,3835.48 3350,3824.48 3362.1,3824.48 3372.1,3814.48 3405.9,3814.48 3410,3818.58 3410,3877 3413,3880 3413,3894 v1(3414,3895) ; M1.J3@5626.51,2514.52 5642.99,2531 5670.49,2531 5674,2534.51 v1(5674,2563) ; M2.H3@5763.78,3175.06 5763.42,3174.69 5763.42,3108.21 5771,3100.62 v1(5771,3099) ; M3.A6@5936.61,4012.13 v1@5936.61,4170.87
  L3_HS1 w6: v1(5771,3099) 5787.63,3115.63 5799.63,3115.63 5854,3170 5854,3285.53 5862,3293.53 5862,3339.84 5856,3345.84 5856,3372.53 5861,3377.53 5861,3444.7 5827.7,3478 5825.73,3478 5764,3539.73 5764,3978 5936.48,4150.48 v1(5936.48,4171)
  L5_SIG w6: v1(3414,3895) 3415.62,3895 3423.87,3903.24 3432.43,3903.24 3438.19,3909 3601.85,3909 3613.85,3921 3761.43,3921 3774.43,3908 4197.29,3908 4197.79,3907.5 4280.21,3907.5 4280.71,3908 4493.33,3908 4499.33,3902 4530.67,3902 4554.67,3878 4672.33,3878 4681.33,3887 4814.33,3887 4828.33,3873 5190,3873 5450,4133 5639.15,4133 5679.15,4173 5816.74,4173 5818.74,4171 v1(5936.48,4171)
  L6_HS2 w6: v1(3771,2143) 3817.72,2143 3895.24,2220.52 3895.24,2265.62 3927.62,2298 3957.62,2298 3959.62,2300 3970.38,2300 3972.38,2298 4027,2298 4052.06,2323.06 4148.42,2323.06 4173.36,2348 4210.64,2348 4220.64,2338 4263.36,2338 4273.36,2348 4310.64,2348 4330.64,2328 4382,2328 4388,2334 5140,2334 5292,2486 5360.62,2486 5379.62,2505 5453.38,2505 5466.38,2492 5519.19,2492 5597.19,2570 5650,2570 5657,2563 v1(5674,2563)
  L8_BOTTOM w6: v1(5674,2563) 5675.15,2564.15 5690.76,2564.15 5740,2613.38 5740,2631.46 5743,2634.46 5743,2810.38 5711,2842.38 5711,3038.62 5752,3079.62 5752,3080 v1(5771,3099)
A10: CN2.06 M1.G7 M2.H4 M3.C6 R7.1 | length 11962.9
  L1_TOP w6: 3025,3901.5 v1(3025,3984.5) ; R7.1@3284.44,2330 3284.44,2361.44 3318,2395 3423.33,2395 3428.33,2390 3435.38,2390 3438.38,2393 v1(3454,2393) ; v1(5747,2602) 5747,2600.38 5752.5,2594.88 M1.G7@5752.5,2577.51 ; M2.H4@5793.31,3175.06 5825,3143.36 v1(5825,3099) ; M3.C6@5936.74,3934.63 v1(5956.11,3954)
  L3_HS1 w6: v1(3025,3984.5) 3039.5,3999 3328.88,3999 3335.88,3992 3614.12,3992 3619.62,3997.5 3711.12,3997.5 3738.85,3969.77 3881,3969.77 4074.77,3776 4344.38,3776 4347.38,3779 4369.62,3779 4477.62,3887 4776.49,3887 4780,3890.51 4780,3905.33 4779,3906.33 4779,3933.67 4816,3970.67 4816,4145 4951.5,4280.5 5931.64,4280.5 6018.85,4193.29 6018.85,3958.36 5960.75,3900.26 5949.99,3900.26 5942.37,3907.88 5942.37,3940.26 v1(5956.11,3954) ; v1(3454,2393) 3454,2391.47 3470.47,2375 3497.53,2375 3590.73,2375 3595.73,2370 3715.57,2370 3720.57,2375 3835.43,2375 3836.43,2376 3882.62,2376 3902.62,2396 3932,2396 3950,2378 3979.38,2378 3987,2385.62 3987,2394.62 3997,2404.62 3997,2412 3997,2421.67 4016.33,2441 4043.67,2441 4061.86,2422.81 4078.02,2422.81 4078.83,2422.87 4187.2,2437.67 cw(c4192,2403) 4216.33,2428.16 4218.65,2428.16 4219.45,2428.16 4292.32,2448 4293.12,2448 4403.43,2448 4412.12,2439.31 4445.26,2439.31 4488.76,2482.81 4488.76,2496.95 4541.81,2550 4663.49,2550 4671,2542.49 4671,2536.64 4684,2523.64 4684,2488.02 4679,2483.02 4679,2481.72 4675,2477.72 4675,2469.72 4671,2465.72 4671,2438.53 4655,2422.53 4655,2403.47 4668.47,2390 4687.53,2390 4827.64,2530.11 4827.64,2531.16 5062.48,2766 5074.01,2766 5081.03,2773.02 5332.69,2773.02 5428,2773 5489,2712 5489,2552.62 5496.62,2545 5511.38,2545 5572.5,2483.89 5572.5,2438.98 5666.47,2345 5685.53,2345 5699,2358.47 5699,2456.43 5698,2457.43 5698,2555.38 5709.92,2567.31 5712.31,2567.31 v1(5747,2602)
  L6_HS2 w6: v1(5825,3099) 5825,3026.51 5821.49,3023 5629.51,3023 5626,3026.51 5626,3062.19 5665,3101.19 5665,3146.53 5626,3185.53 5626,3439.49 5629.51,3443 5716,3443 5737,3464 5737,3495.67 5805.89,3564.56 5805.89,3582.79 5813.51,3590.41 5831.74,3590.41 5889.63,3648.3 5889.63,3866.53 5911.36,3888.26 5920.64,3888.26 5942.37,3909.99 5942.37,3918.64 5955.86,3932.13 5955.86,3953.75 v1(5956.11,3954)
  L8_BOTTOM w6: v1(5747,2602) 5723.12,2578.12 5720.73,2578.12 5698,2555.38 5698,2526.65 5722.88,2501.77 5733.64,2501.77 5736.64,2504.77 5963.54,2504.77 5980,2521.23 5980,2824.53 5971.62,2832.91 5971.62,3106.05 5906,3171.67 5906,3369.14 5918.86,3382 6113.81,3382 6198.95,3296.86 6213.28,3296.86 6237.42,3320.99 6237.42,3537.13 6131.48,3643.07 6131.48,3948.27 6169.1,3985.89 6179.87,3985.89 6187.48,3978.27 6187.48,3928.13 6179.87,3920.52 6178.21,3920.52 6161.48,3903.79 6161.48,3888.76 6169.1,3881.15 6179.87,3881.15 6207.48,3908.76 6207.48,3986.56 6188.15,4005.89 6008,4005.89 v1(5956.11,3954)